# EAGLE board QwiicBus_Endpoint_MPU (EAGLE 9.7.0)
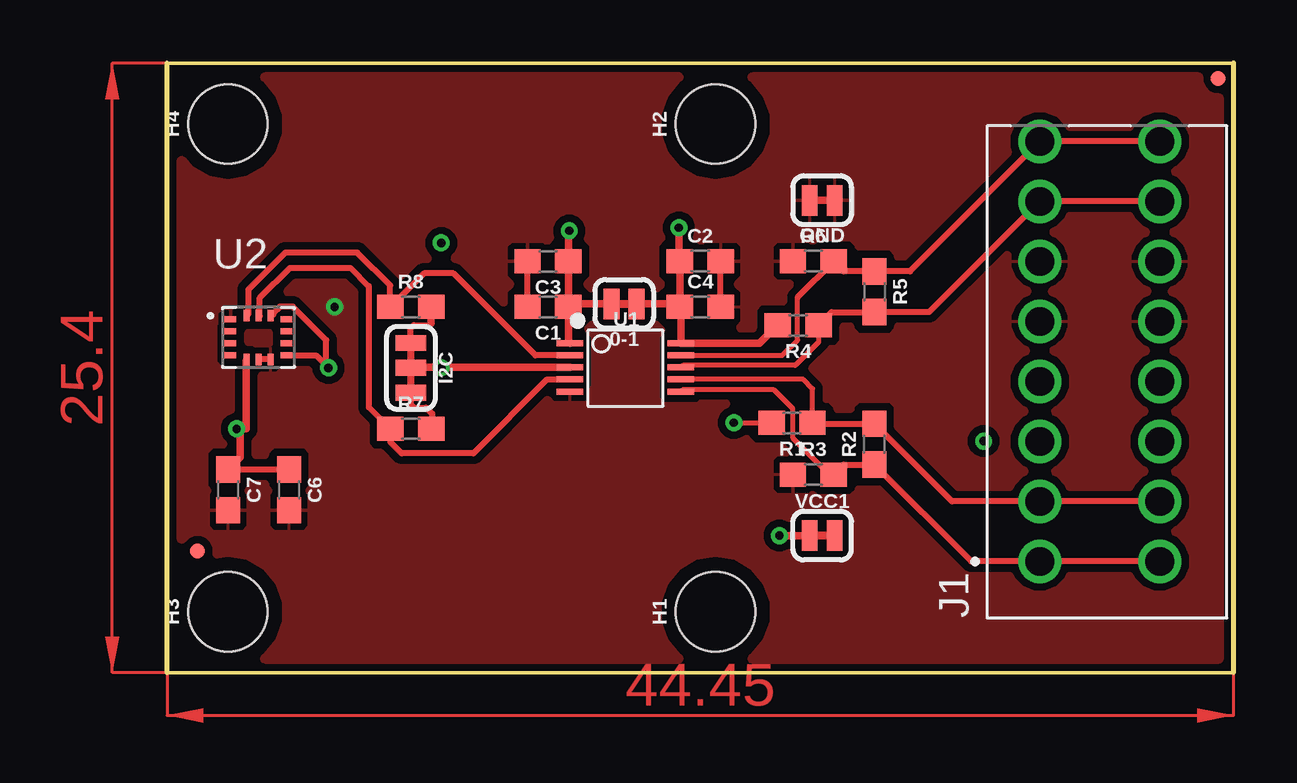
[diagram p0: board, top side]
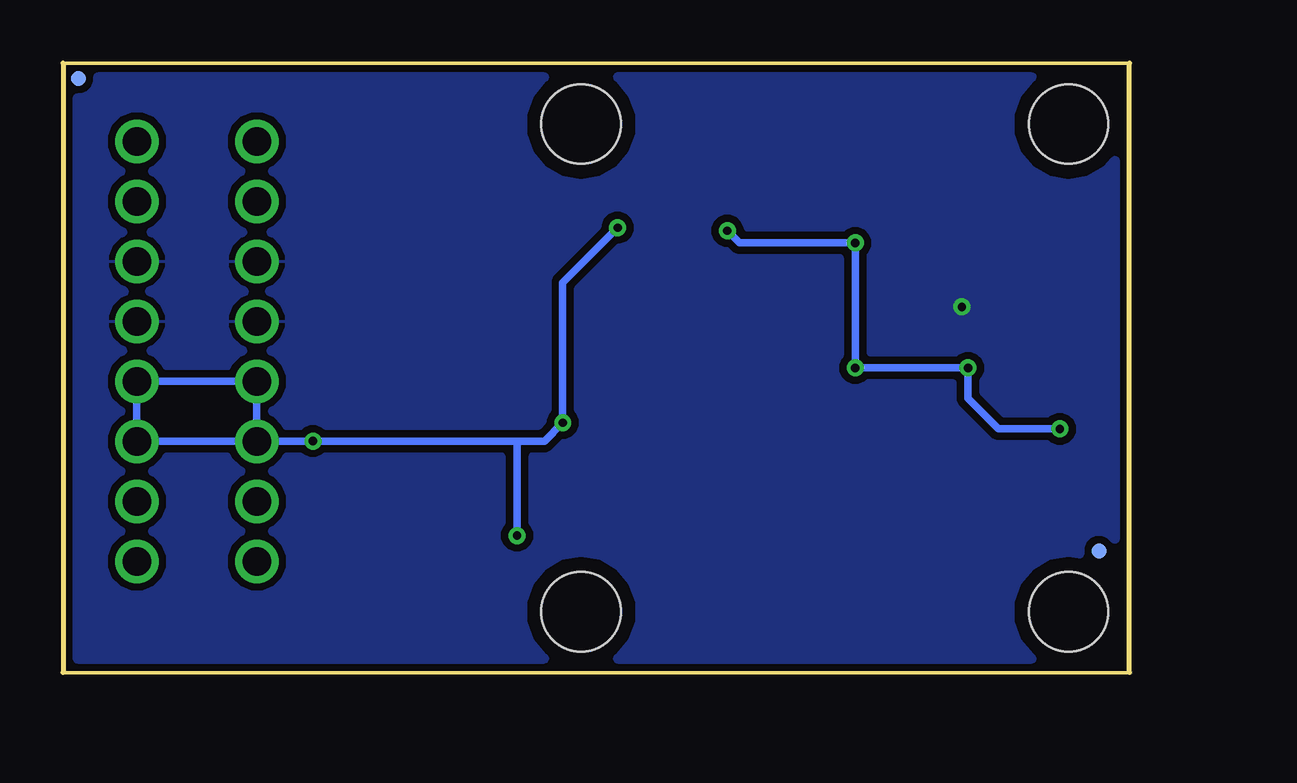
[diagram p1: board, bottom side, seen from below]

Size 44.45 x 25.4 mm. Coordinates in mm from the lower left corner, seen from the top.
Outline: 0,0 0,25.4 44.45,25.4 44.45,0 0,0
Copper layers (1*16): Top / Bottom
Stack-up Default Layer Stack: Top User Defined 0.035mm / Dielectric-1 User Defined 1.5mm / Bottom User Defined 0.035mm
Design rules: minimum copper width classes=1 15mil, minimum copper width classes=0 8mil, minimum copper width 7mil, minimum drill size 12mil, copper clearance classes=1 to classes=1 10mil, copper clearance wire_polygon to wire_polygon 7mil, copper clearance wire_polygon to pad_smd 7mil, copper clearance wire_polygon to via 7mil, copper clearance pad_smd to pad_smd 7mil, copper clearance pad_smd to via 7mil, copper clearance via to via 7mil, copper clearance smd to pad (same net) 7mil, copper clearance smd to via (same net) 7mil, copper clearance smd to smd (same net) 7mil, dimension clearance 7mil, via restrict clearance 0mil, restrict clearance 0mil, drill distance 7mil, keepout clearance 0mil
Net classes: 0 default: width 0.203 mm; 1 power: width 0.381 mm, clearance 0.254 mm

## Footprints (pad centres in the part's own frame; a part is rotated, then mirrored left to right if it is on the bottom)
SMT-JUMPER_2_NC_TRACE_SILK = smd 0.66 x 1.27: 1 -0.521,0; 2 0.521,0
0603 = smd 1.1 x 1: 1 -0.85,0; 2 0.85,0
FIDUCIAL-MICRO = smd 0.635 x 0.635: 1 0,0
STAND-OFF = hole 3.302: 0,0
SMT-JUMPER_3_2-NC_TRACE_SILK = smd 0.66 x 1.27: 1 -1.041,0; 2 0,0; 3 1.041,0
PHOENIX_1770940 = drill 1.2: 1_1 2.35,7.8; 1_2 2.35,2.8; 2_1 4.85,7.8; 2_2 4.85,2.8; 3_1 7.35,7.8; 3_2 7.35,2.8; 4_1 9.85,7.8; 4_2 9.85,2.8; 5_1 12.35,7.8; 5_2 12.35,2.8; 6_1 14.85,7.8; 6_2 14.85,2.8; 7_1 17.35,7.8; 7_2 17.35,2.8; 8_1 19.85,7.8; 8_2 19.85,2.8
TSSOP10 = smd 1.1 x 0.25: 1 -2.259,1.018; 2 -2.259,0.517; 3 -2.259,0.018; 4 -2.259,-0.482; 5 -2.259,-0.988; 6 2.366,-0.988; 7 2.366,-0.482; 8 2.366,0.018; 9 2.366,0.517; 10 2.366,1.018
XDCR_BMI270 = smd 0.475 x 0.25: 1 -1.163,0.75; 2 -1.163,0.25; 3 -1.163,-0.25; 4 -1.163,-0.75; 8 1.163,-0.75; 9 1.163,-0.25; 10 1.163,0.25; 11 1.163,0.75 | smd 0.25 x 0.475: 5 -0.5,-0.912; 6 0,-0.912; 7 0.5,-0.912; 12 0.5,0.912; 13 0,0.912; 14 -0.5,0.912

## Placement (x,y rotation side)
0-1  JUMPER-SMT_2_NC_TRACE_SILK  [SMT-JUMPER_2_NC_TRACE_SILK]  19.05,15.37 180 top
C1  0.1uF  [0603]  15.88,15.24 180 top
C2  0.1uF  [0603]  22.23,17.14 0 top
C3  1.0uF  [0603]  15.88,17.14 180 top
C4  1.0uF  [0603]  22.23,15.24 0 top
C6  0.1uF  [0603]  5.08,7.62 270 top
C7  0.1uF  [0603]  2.54,7.62 270 top
FD1  FIDUCIALUFIDUCIAL  [FIDUCIAL-MICRO]  1.27,5.08 0 top
FD2  FIDUCIALUFIDUCIAL  [FIDUCIAL-MICRO]  43.81,24.77 0 top
FD3  FIDUCIALUFIDUCIAL  [FIDUCIAL-MICRO]  1.27,5.08 0 bottom
FD4  FIDUCIALUFIDUCIAL  [FIDUCIAL-MICRO]  43.81,24.77 0 bottom
FRAME1  FRAME-LETTER  [CREATIVE_COMMONS]  -16.51,-8.89 0 top  (outside the outline)
GND  JUMPER-SMT_2_NC_TRACE_SILK  [SMT-JUMPER_2_NC_TRACE_SILK]  27.3,19.68 180 top
H1  STAND-OFF  [STAND-OFF]  22.86,2.54 90 top
H2  STAND-OFF  [STAND-OFF]  22.86,22.86 90 top
H3  STAND-OFF  [STAND-OFF]  2.54,2.54 90 top
H4  STAND-OFF  [STAND-OFF]  2.54,22.86 90 top
I2C  JUMPER-SMT_3_2-NC_TRACE_SILK  [SMT-JUMPER_3_2-NC_TRACE_SILK]  10.16,12.7 270 top
J1  1770940  [PHOENIX_1770940]  44.17,2.29 90 top
LOGO2  REVISION  [REVISION]  -5.08,-11.43 0 top  (outside the outline)
R1  390  [0603]  26.05,10.41 180 top
R2  100  [0603]  29.48,9.53 90 top
R3  390  [0603]  26.94,8.26 0 top
R4  390  [0603]  26.3,14.48 180 top
R5  100  [0603]  29.48,15.88 270 top
R6  390  [0603]  26.94,17.14 0 top
R7  4.7k  [0603]  10.16,10.16 0 top
R8  4.7k  [0603]  10.16,15.24 0 top
U1  PCA9615  [TSSOP10]  19.05,12.7 0 top
U2  BMI270  [XDCR_BMI270]  3.81,13.97 0 top
VCC1  JUMPER-SMT_2_NC_TRACE_SILK  [SMT-JUMPER_2_NC_TRACE_SILK]  27.3,5.71 0 top

## Library data of the parts
0-1 GND I2C VCC1 = SparkFun-Jumpers
C1 C2 C6 C7 = SparkFun-Capacitors; PROD_ID: CAP-00810
C3 C4 = SparkFun-Capacitors; PROD_ID: CAP-00868
FD1-FD4 FRAME1 LOGO2 = SparkFun-Aesthetics
H1-H4 = SparkFun-Hardware
J1 = 1770940; AVAILABILITY: In Stock; CHECK_PRICES: https://www.snapeda.com/parts/1770940/Phoenix+Contact/view-part/?ref=eda; DESCRIPTION: 8 Position Wire to Board Terminal Block Horizontal with Board 0.098 (2.50mm) Through Hole; MF: Phoenix Contact; MP: 1770940; PACKAGE: None; PRICE: None; SNAPEDA_LINK: https://www.snapeda.com/parts/1770940/Phoenix+Contact/view-part/?ref=snap
R1 R3 R4 R6 = SparkFun-Resistors; PROD_ID: RES-07864
R2 R5 = SparkFun-Resistors; PROD_ID: RES-07863
R7 R8 = SparkFun-Resistors; PROD_ID: RES-07857
U1 = SparkFun-IC-Comms; PROD_ID: IC-13899
U2 = BMI270; AVAILABILITY: In Stock; CHECK_PRICES: https://www.snapeda.com/parts/BMI270/Bosch/view-part/?ref=eda; DESCRIPTION: Accelerometer, Gyroscope, 6 Axis Sensor I2C, SPI Output; MF: Bosch Sensortec; MP: BMI270; PACKAGE: LGA-14 Bosch Sensortec; PRICE: None; SNAPEDA_LINK: https://www.snapeda.com/parts/BMI270/Bosch/view-part/?ref=snap

## Nets
DSCL_N: J1.1_1 J1.1_2 R2.1 R3.2 U1.6
DSCL_P: J1.2_1 J1.2_2 R1.1 R2.2 U1.7
DSDA_N: J1.8_1 J1.8_2 R5.1 R6.2 U1.9
DSDA_P: J1.7_1 J1.7_2 R4.1 R5.2 U1.8
GND: C1.2 C2.2 C3.2 C4.2 C6.2 C7.2 GND.1 GND.2 J1.5_1 J1.5_2 J1.6_1 J1.6_2 R3.1 R6.1 U1.5 U2.1 U2.6 U2.7
N$3: I2C.1 R8.2
N$4: I2C.3 R7.2
SCL: R7.1 U1.4 U2.13
SDA: R8.1 U1.2 U2.14
VCC: 0-1.2 C1.1 C3.1 C6.1 C7.1 I2C.2 U1.1 U1.3 U2.5 U2.8 U2.12
VCC_1: 0-1.1 C2.1 C4.1 J1.3_1 J1.3_2 J1.4_1 J1.4_2 R1.2 R4.2 U1.10 VCC1.1 VCC1.2

## Tracks (layer width: path | path; a pad name or v marks a point on that pad's centre or on a via)
DSCL_N
  Top 0.203: R3.2 27.61,8.26 26.07,9.8 26.07,11.01 25.27,11.81 21.52,11.81 U1.6
  Top 0.254: R3.2 28.21,8.68 R2.1 33.52,4.64 J1.1_1 J1.1_2
DSCL_P
  Top 0.203: 26.94,10.38 R1.1 26.9,11.83 26.52,12.22 U1.7
  Top 0.254: 26.94,10.38 R2.2 32.72,7.14 J1.2_1 J1.2_2
DSDA_N
  Top 0.203: U1.9 25.64,13.22 26.28,13.86 26.28,15.64
  Top 0.254: J1.8_2 J1.8_1 30.96,16.73 R5.1 28.21,16.73 R6.2 26.28,15.64
DSDA_P
  Top 0.203: U1.8 21.51,12.81 26.19,12.81 27.16,13.78 R4.1
  Top 0.254: J1.7_2 J1.7_1 31.76,15.03 R5.2 27.7,15.03 R4.1
GND  (via drill 0.35)
  Top 0.254: C1.2 C3.2 | C4.2 C2.2 | U2.7 U2.6
  other vias: 6.99,15.24
  pour Bottom (isolate 0.305): -0.25,25.4 44.58,25.4 44.83,25.15 44.83,-0.13 0.25,-0.13 0.13,0
  pour Top (isolate 0.305): -0.13,25.53 44.32,25.53 44.45,25.4 44.45,0.25 44.7,0 0,0 -0.25,0.25 -0.13,0.25
N$3
  Top 0.254: 11.01,14.57 10.92,14.48 10.29,14.48 10.16,14.35 I2C.1
  Top 0.305: 11.01,14.57 R8.2
N$4
  Top 0.254: R7.2 11.05,10.2 11.05,10.79 10.79,11.05 10.29,11.05 10.16,11.18 I2C.3
SCL
  Top 0.254: U1.4 15.85,12.22 12.77,9.14 9.78,9.14 9.31,9.61 R7.1 8.41,11.06 8.41,16.11 7.65,16.87 5.12,16.87 3.87,15.61 3.87,14.87
SDA
  Top 0.203: R8.1 9.3,15.25
  Top 0.254: U1.2 15.36,13.22 11.94,16.64 10.71,16.64 R8.1 | 9.3,15.25 9.3,16.14 7.93,17.51 4.93,17.51 3.38,15.96 3.38,14.95 U2.14
VCC  (via drill 0.35)
  Top 0.203: 11.45,12.72 v11.43,12.7 | I2C.2 10.18,12.72 | 16.73,18.38 v16.76,18.41 | 4.38,14.88 U2.12 | v6.73,12.7 6.63,12.8
  Top 0.254: C6.1 C7.1 | U2.8 6.21,13.22 v6.73,12.7 | 4.38,14.88 4.43,14.94 4.43,14.97 4.71,15.25 5.24,15.25 6.63,13.85 6.63,12.8
  Top 0.305: 3.05,10.16 3.05,8.98 C7.1 | C1.1 16.85,15.37 0-1.2 | C1.1 C3.1 16.73,18.38 | U1.3 11.45,12.72 10.18,12.72 | U1.1 16.73,13.78 C1.1 | 3.3,13 3.3,10.16 3.05,10.16 | 3.05,10.16 v2.9,10.16
  Bottom 0.305: v16.76,18.41 16.26,17.91 v11.43,17.91 v11.43,12.7 v6.73,12.7 6.73,11.43 5.46,10.16 v2.9,10.16
VCC_1  (via drill 0.35)
  Top 0.203: v23.62,10.41 R1.2
  Top 0.305: 0-1.1 21.25,15.37 C4.1 | C4.1 C2.1 21.34,17.18 v21.34,18.54 | C4.1 21.42,15.2 U1.10 24.7,13.72 R4.2 | v25.53,5.71 VCC1.1 VCC1.2
  Bottom 0.203: 34.05,9.64 v34.04,9.65
  Bottom 0.305: J1.3_1 J1.3_2 J1.4_2 J1.4_1 J1.3_1 | J1.3_1 34.05,9.64 | v34.04,9.65 25.4,9.65 | 25.4,9.65 24.38,9.65 v23.62,10.41 23.62,16.26 v21.34,18.54 | v25.53,5.71 25.53,9.53 25.4,9.65
(copper drawn outside any net)
  shapes: Top area x2

## Text on the board
tDocu: Joel Bartlett | Keaton Rohrer